# Altium PCB AVP32F2812_EVM_V1.0.PcbDoc (part 3 of 3)
Units mil, origin at the board's own origin, x right, y up, seen from the top; angles counter-clockwise.
Board outline 5669.29 x 3897.64 mil, 2 copper layers (Top Layer, Bottom Layer); 154 components, 189 nets, 732 pads, 469 vias.
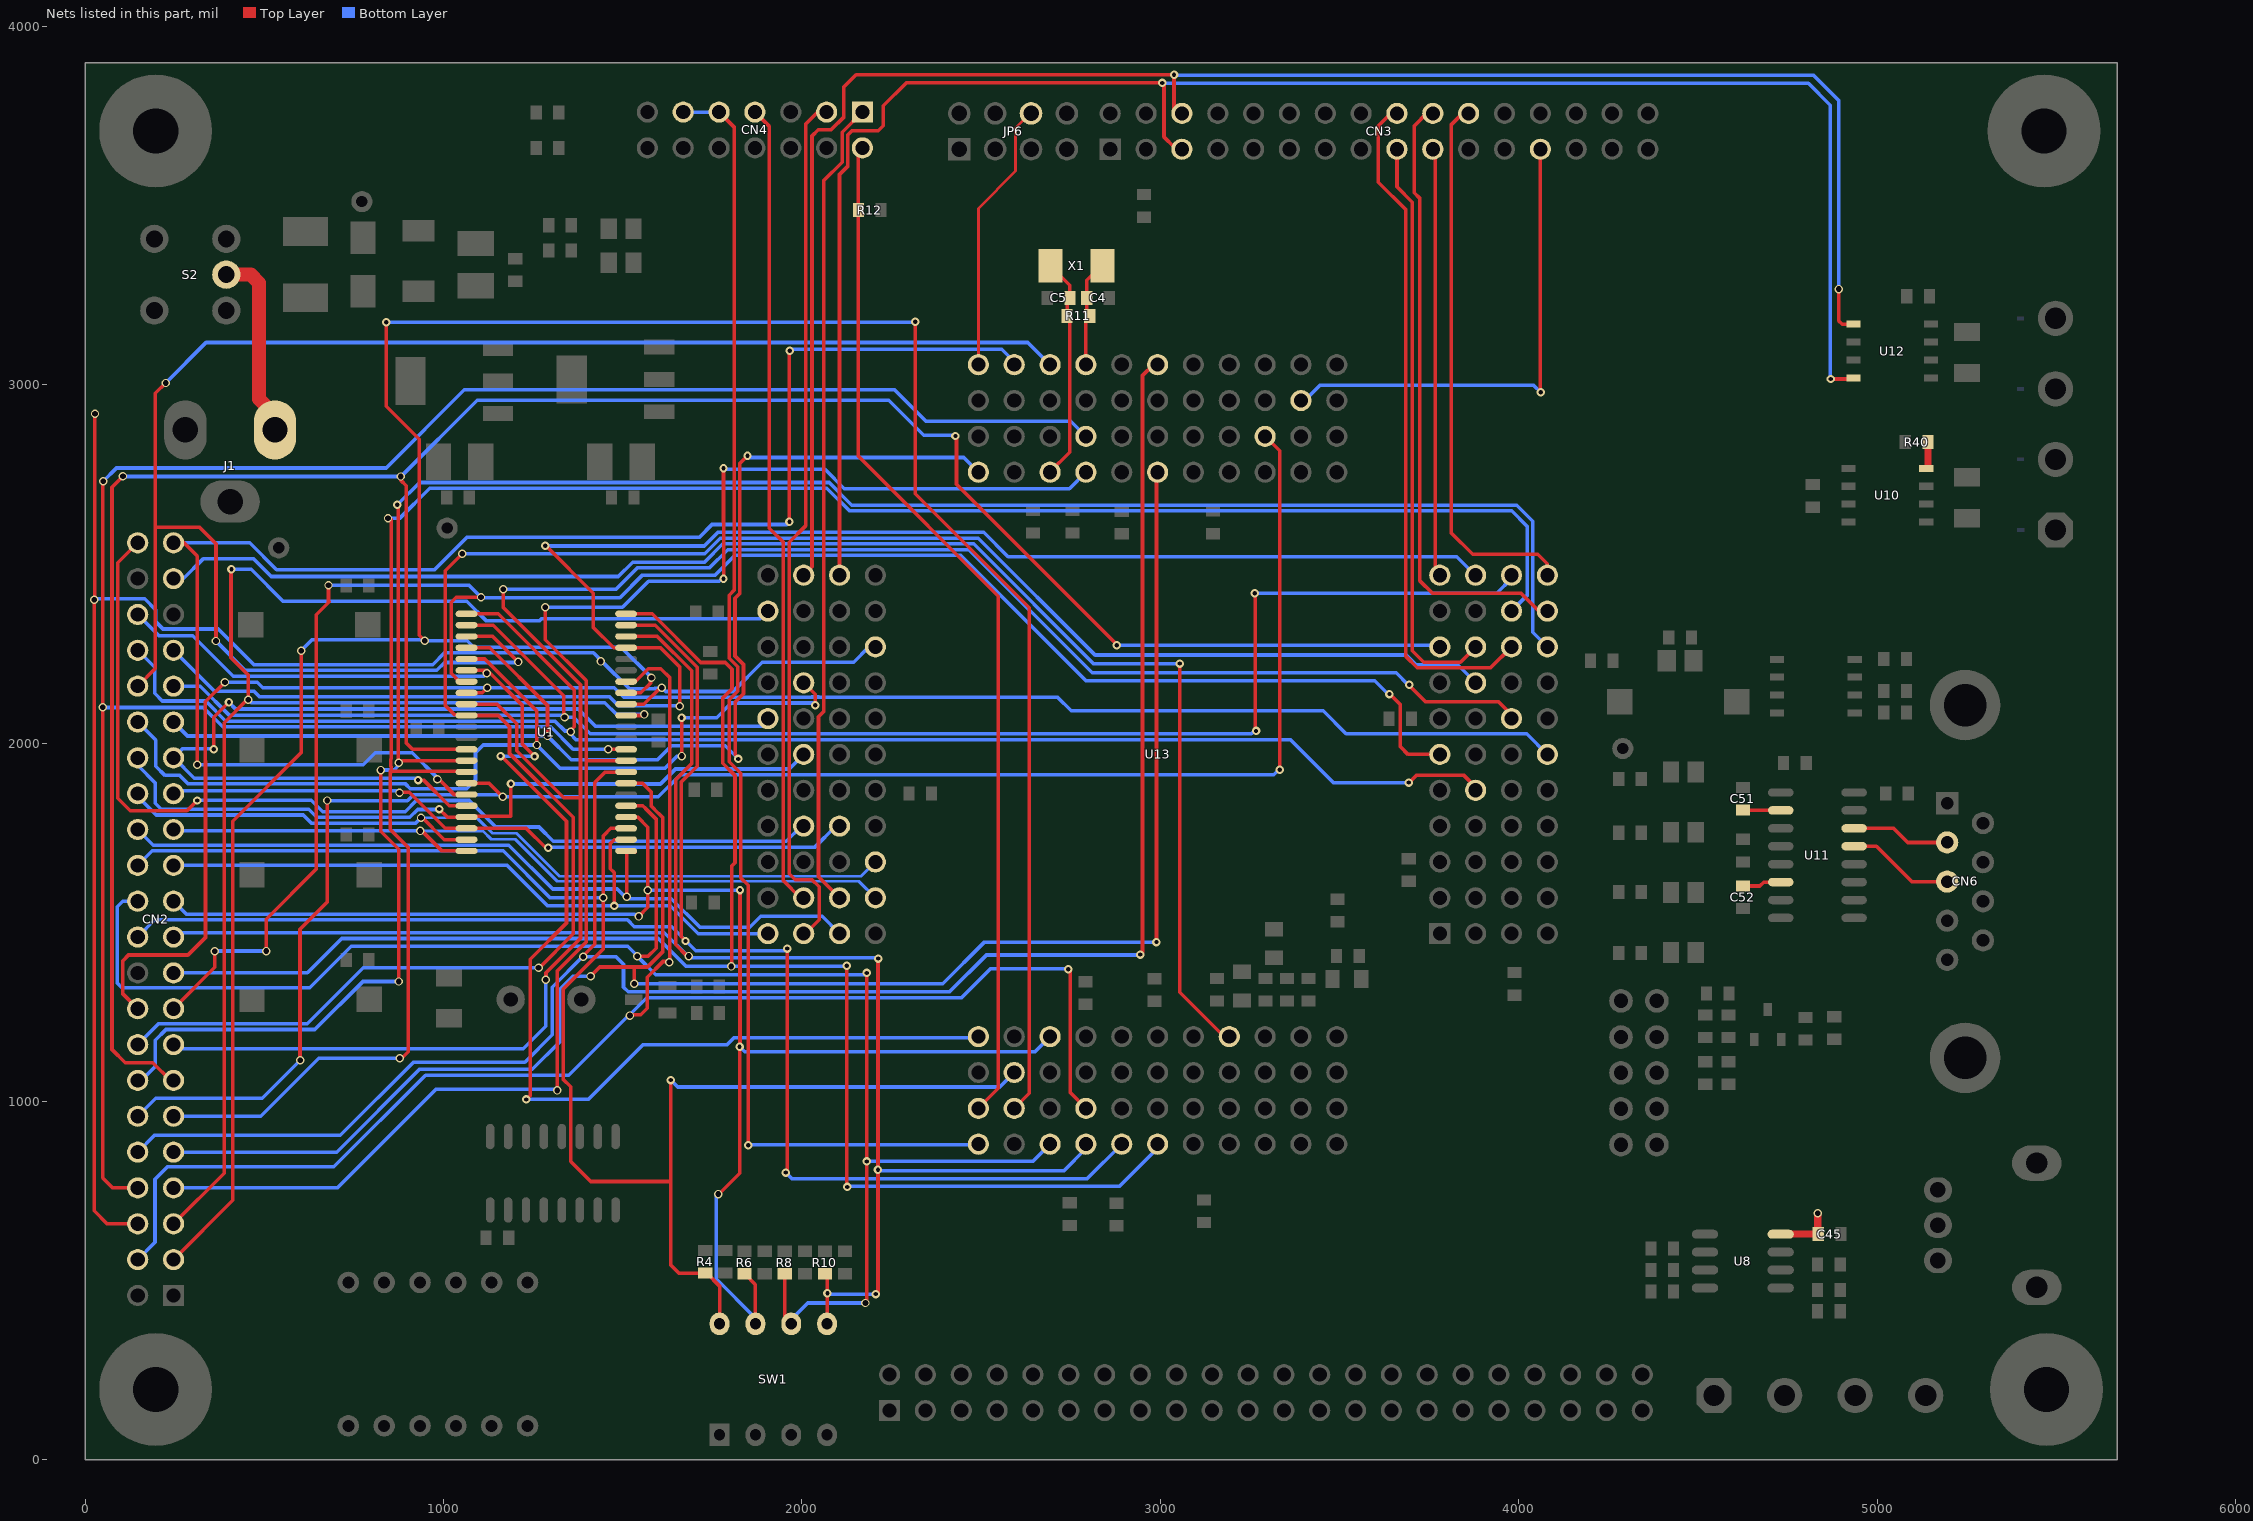
[diagram p3: the nets of this part, all layers, seen from the top]

## Via types
v1: diameter 23.62, hole 11.81, Top Layer to Bottom Layer, tented both sides, 308 vias
v2: diameter 23.62, hole 15.75, Top Layer to Bottom Layer, 161 vias

## Nets (pads, with @x,y where several pads share a name; then routed paths per layer and width w, separated by ;. In a path a pad name is that pad's centre, name@x,y a point inside that pad or via, vN(x,y) a via of type N, cw(c..) or ccw(c..) an arc to the next point about the centre after c; other vN are vias at no path point) (continued)
NetR40_2: R40.2 U10.8 | length 73.6
  Top Layer w19.68: U10.8@5140.98,2766.8 5141.34,2766.8 5141.5,2766.96 R40.2@5141.5,2840
R/W: CN3.25 U13.51 | length 1380.2
  Top Layer w10: CN3.25@4044,3658 4060,3642 4060,2980 v1(4061,2979)
  Bottom Layer w10: U13.51@3392.13,2955.9 3402.9,2955.9 3445,2998 4042,2998 v1(4061,2979)
RS232_1_RX: CN6.3 U11.13 | length 300.3
  Top Layer w10: U11.13@4935.51,1712.28 4997.72,1712.28 5096.24,1613.76 CN6.3@5195,1613.76
RS232_1_TX: CN6.2 U11.14 | length 275.8
  Top Layer w10: U11.14@4935.51,1762.28 5045.44,1762.28 5084.8,1722.92 CN6.2@5195,1722.92
SCIRXDC: CN3.6 U12.1 U13.91 | length 5024.6
  Top Layer w10: U13.91@2004.73,2468.5 2028,2491.78 2028,3694 2045,3711 2081,3711 2117,3747 2117,3831 2150.81,3864.81 3037.19,3864.81 v1@3038,3864 ; v1(3038,3865) v1@3038,3864 ; CN3.6@3044,3758 3038,3764 v1@3038,3864 ; v2(4893,3267) 4893,3178 4902,3169 U12.1@4933.73,3169
  Bottom Layer w10: v1(3038,3865) 3038,3860 3041,3863 4823,3863 4893,3793 v2(4893,3267)
SCITXDC: CN3.5 U12.4 U13.90 | length 5131.3
  Top Layer w10: U13.90@2110,2473.78 U13.90@2104.73,2468.5 2104.73,3586.73 2128.13,3610.13 2128.13,3697.63 2139.5,3709 2213,3709 2227,3723 2227,3778 2291,3842 v1(3005,3842) ; CN3.5@3039,3662.41 3010,3691.41 3010,3837 v1@3005.5,3841.5 ; v1(4870,3016) 4930.73,3016 U12.4@4933.73,3019 ; v1(3005,3842) 3005,3841 v1@3005.5,3841.5 ; v1(3005,3842) 3006,3842 v1@3005.5,3841.5 ; v1(3005,3842) v1@3005.5,3841.5
  Bottom Layer w10: v1(3005,3842) 3006,3841 4808,3841 4869,3780 4869,3017 v1(4870,3016)
SPI_CLK: CN3.17 U13.34 | length 1631.8
  Top Layer w10: CN3.17@3644,3658 3660,3642 3660,3552 3703,3509 3703,2258 3735,2226 3837.02,2226 U13.34@3879.53,2268.5
SPI_CSN: CN3.18 U13.35 | length 1900.8
  Top Layer w10: CN3.18@3644,3752 3644,3758 3608,3722 3608,3565 3685,3488 3685,2242 3717,2210 3921.02,2210 U13.35@3979.53,2268.5
SPI_SIMO: CN3.20 U13.40 | length 1717.1
  Top Layer w10: CN3.20@3744,3758 3708,3722 3708,3536 3723,3521 3723,2454 3759,2418 4006,2418 4055.5,2368.5 U13.40@4079.53,2368.5
SPI_SOMI: CN3.19 U13.41 | length 1204.2
  Top Layer w10: CN3.19@3744,3658 3767,3635 3767,2481.03 U13.41@3779.53,2468.5
TCK: CN4.9 CN4.11 U13.136 | length 3690.7
  Top Layer w10: CN4.9@1768.66,3760.79 1810.45,3719 1810.45,2426.45 1797,2413 1797,2236.63 1820.81,2212.82 1820.81,2145.18 1797,2121.37 1797,1948.25 1829,1916.25 1829,1624 1849.81,1603.19 v1@1849.81,878
  Bottom Layer w10: CN4.11@1668.66,3760.79 CN4.9@1768.66,3760.79 ; v1(1850,878) 1852,880 2491.02,880 U13.136@2492.13,881.1
TDI: CN4.3 U13.131 | length 2433.1
  Top Layer w10: U13.131@2004.73,1468.5 2009.5,1468.5 2048,1507 2048,1599 2028,1619 1981,1619 1964.2,1635.8 1964.2,2560.2 2010,2606 2010,3727 2043.79,3760.79 CN4.3@2068.66,3760.79
TDO: CN4.7 U13.127 | length 2254.2
  Top Layer w10: CN4.7@1868.66,3760.79 1909.19,3720.26 1909.19,3644 1909,3643.81 1909,2600 1948.2,2560.8 1948.2,1615.8 1995.5,1568.5 U13.127@2004.73,1568.5
TMS: CN4.1 U13.126 | length 2284.8
  Top Layer w10: U13.126@2104.73,1568.5 2046,1627.23 2046,2073.75 2061.25,2089 2061.25,2491.92 2061,2492.17 2061,3570 2112.13,3621.13 2112.13,3704.26 CN4.1@2168.66,3760.79 CN4.1@2168.66,3743.66
TRSTN: CN4.2 R12.2 U13.135 | length 2869.2
  Top Layer w10: CN4.2@2168.66,3660.79 2157.5,3649.63 R12.2@2157.5,3487 2157.5,2800.5 2548,2410 2548,1036.98 U13.135@2492.13,981.1
V+: C51.1 U11.2 | length 100.5
  Top Layer w10: C51.1@4625,1813.5 4626.22,1812.28 U11.2@4725,1812.28
V-: C52.1 U11.6 | length 110.3
  Top Layer w10: C52.1@4625,1601.5 4672.44,1601.5 4683.23,1612.28 U11.6@4730.79,1612.28
VDDA: C45.2 U8.8 | length 163
  Top Layer w19.68: U8.8@4730.61,630 C45.2@4833.5,630 ; v2(4834,688) 4834,635.73 4837.61,632.12 C45.2@4835.68,630.19
VIN+: J1.1 S2.2 | length 529.3
  Top Layer w39.37: S2.2@393.7,3307.09 461.94,3307.09 485,3284.02 485,2960.07 529.58,2915.49 J1.1@529.58,2874.02
X1: C5.2 R11.2 U13.77 X1.1 | length 622.7
  Top Layer w10: U13.77@2692.13,2755.9 2692.13,2757.13 2746.65,2811.65 2746.65,3180.35 R11.2@2739.5,3187.5 ; X1.1@2693.16,3332 2747.5,3277.67 C5.2@2747.5,3242 2740,3234.5 R11.2@2740,3192
X2: C4.1 R11.1 U13.76 X1.2 | length 303.4
  Top Layer w10: U13.76@2792.13,3055.9 R11.1@2792.13,3181.63 ; R11.1@2792.13,3183.63 R11.1@2792.13,3181.63 ; R11.1@2802.5,3192 R11.1@2792.13,3181.63 ; R11.1@2804,3195.5 2794.5,3204.99 2794.5,3291.5 2835,3332 X1.2@2838.83,3332
XA0: CN2.38 U1.1 U13.18 | length 4473.6
  Top Layer w10: U1.1@1064.08,2360.71 1152.44,2360.71 1365,2148.16 1365,2045.9 1354.44,2035.34 v2(1354.44,2031.65) ; v1@3693,1889 3714,1910 3847,1910 3879.53,1877.47 U13.18@3879.53,1868.5
  Bottom Layer w10: CN2.38@146.61,2259.05 194,2211.67 194,2139 215.44,2117.56 336.44,2117.56 392.72,2061.28 1138.77,2061.28 1138.87,2061.38 1311.12,2061.38 1338.68,2033.81 1352.29,2033.81 v2(1354.44,2031.65) 1354.44,2024.56 1369,2010 3362,2010 3482,1890 v1(3693,1890)
XA1: CN2.35 U1.2 U13.43 | length 4624
  Top Layer w10: U1.2@1064.08,2329.21 1138.44,2329.21 1335.47,2132.19 1335.47,2074.49 v2(1337.47,2072.48) ; v1@3264,2418 3264.19,2417.81 3264.19,2036.81 v1(3267,2034)
  Bottom Layer w10: CN2.35@246.61,2159.05 320.95,2159.05 402.72,2077.28 1132.14,2077.28 1132.24,2077.38 1338.99,2077.38 1339.09,2077.28 1340.1,2076.64 1341.53,2075.74 v2@1345.34,2072.48 ; v2(1337.47,2072.48) v2@1345.34,2072.48 ; v1@3267,2039 3254,2026 1409,2026 1362.52,2072.48 v2@1345.34,2072.48 ; v1@3269,2418 3938,2418 3979.53,2459.53 U13.43@3979.53,2468.5
  other v1: 3263,2418
XA2: CN2.36 U1.3 U13.80 | length 4938.1
  Top Layer w10: CN2.36@146.61,2159.05 196,2208.44 196,2601.83 ; v2(224.44,3004.83) 196,2976.38 196,2601.83 ; v2(365,2285) 365,2556.27 319.44,2601.83 196,2601.83 ; U1.3@1064.08,2297.72 1137.16,2297.72 v2(1208.34,2226.54)
  Bottom Layer w10: v2(224.44,3004.83) 337.43,3117.81 2630.22,3117.81 U13.80@2692.13,3055.9 ; v2(365,2285) 447,2203 980.94,2203 1002.94,2225 1206.79,2225 v2(1208.34,2226.54)
XA3: CN2.33 U1.4 U13.85 | length 3564.8
  Top Layer w10: U1.4@1064.08,2266.22 1128.78,2266.22 1290,2105 v2(1290,2020) ; v1(1822,1956) 1822,1960 1814,1968 1814,2115 1836.81,2137.81 1836.81,2219.44 1813,2243.25 1813,2404 1826.45,2417.45 1826.45,2780.45 v1(1848,2802)
  Bottom Layer w10: CN2.33@246.61,2059.05 285.67,2020 v2(1290,2020) 1356,1954 1449.63,1954 1449.72,1954.09 1597.09,1954.09 1636,1993 1786,1993 v1@1815.5,1963.5 ; v1(1848,2802) 1853,2797 2451.03,2797 U13.85@2492.13,2755.9
XA4: CN2.34 U1.5 U13.103 | length 2701.4
  Top Layer w10: U1.5@1064.08,2234.72 1114.55,2234.72 1259.81,2089.46 v2(1259.81,1994.81) ; v1(1664,2071) 1665,2070 v2(1665,1964) ; U13.103@2004.73,2168.5 2037,2136.23 v1(2037,2106)
  Bottom Layer w10: CN2.34@146.61,2059.05 197,2008.67 197,1936 223,1910 264,1910 287.81,1886.19 893.81,1886.19 907,1873 1064.73,1873 1089,1897.27 1089,1972.81 1111,1994.81 v2(1259.81,1994.81) 1324.62,1930 1618,1930 1652,1964 v2(1665,1964) ; v1(1664,2071) 1762,2071 1802.98,2111.98 2031.02,2111.98 v1(2037,2106) v1@2038,2105
XA5: CN2.31 U1.18 U13.108 | length 2697.3
  Top Layer w10: v1(359,1983) 359,2072 v1(401,2114) v1@403,2116 ; v1(929,1897) 944,1897 1015.72,1825.28 U1.18@1064.08,1825.28
  Bottom Layer w10: v1@361,1984 271.56,1984 CN2.31@246.61,1959.05 247.95,1959.05 304.81,1902.19 923.81,1902.19 v1(929,1897) ; v1(401,2114) 419.71,2095.29 1375.71,2095.29 1424,2047 1897,2047 1904.73,2054.73 U13.108@1904.73,2068.5
XA6: CN2.32 U1.19 U13.111 | length 2122.3
  Top Layer w10: v1(988,1816) 1010.22,1793.78 U1.19@1064.08,1793.78 1066.3,1796 1188,1796 v1(1188,1887)
  Bottom Layer w10: CN2.32@146.61,1959.05 146.61,1938.39 196,1889 196,1832 212.42,1815.58 623.42,1815.58 646,1793 905.74,1793 927.55,1814.81 985.81,1814.81 v1@991,1820 ; v1(1188,1887) 1189,1886 1605,1886 1647,1928 1887.92,1928 ; 1887.94,1927.98 1964.2,1927.98 U13.111@2004.73,1968.5
XA7: CN2.29 U1.20 U13.118 | length 1953.8
  Top Layer w10: v2(877,1862) 878,1863 904.26,1863 1004.98,1762.28 U1.20@1064.08,1762.28 1064.8,1763 1230,1763 1285,1708 v1(1292,1708)
  Bottom Layer w10: CN2.29@246.61,1859.05 254.56,1867 872,1867 v2(877,1862) ; v1(1292,1708) 1293,1709 1887.91,1709 ; 1887.94,1709.03 1921.51,1709.03 ; 1921.54,1709 1987.91,1709 ; 1987.94,1709.03 2021.51,1709.03 ; 2021.54,1709 2035,1709 2094.5,1768.5 U13.118@2104.73,1768.5
XA8: CN2.30 U1.21 U13.121 | length 2344.9
  Top Layer w10: v2(937,1792) 937,1796 1002.21,1730.79 U1.21@1064.08,1730.79
  Bottom Layer w8: v2(937,1792) 1092.8,1792 1136.22,1748.58 1203.42,1748.58 1323.19,1628.81 2165.03,1628.81 U13.121@2204.73,1668.5
  Bottom Layer w10: CN2.30@146.61,1859.05 146.61,1851.39 198.42,1799.58 608.42,1799.58 631,1777 922,1777 v2(937,1792)
XA9: CN2.27 U1.22 U13.125 | length 2189.2
  Top Layer w10: v2(935,1755) 939.77,1755 995.48,1699.29 U1.22@1064.08,1699.29
  Bottom Layer w8: v2(935,1755) 1110,1755 1133,1732 1200.2,1732 1317.39,1614.81 2158.42,1614.81 U13.125@2204.73,1568.5
  Bottom Layer w10: CN2.27@246.61,1759.05 249.67,1756 934,1756 v2(935,1755)
XA10: CN2.28 U1.23 U13.130 | length 2263.7
  Top Layer w10: v2(1511,1571) 1511,1694.89 1508,1697.89 U1.23@1509.4,1699.29 1531.44,1699.29 U1.23@1535,1695.74
  Bottom Layer w10: CN2.28@146.61,1759.05 190.09,1715.58 1182.05,1715.58 1304.63,1593 1485,1593 1507,1571 v2(1511,1571) 1511,1567 1511.81,1566.19 1635.06,1566.19 1715.25,1486 1854,1486 1885,1517 2056.23,1517 U13.130@2104.73,1468.5
XA11: CN2.25 U1.24 U13.132 | length 1964.5
  Top Layer w10: v1(1476,1546) 1476,1639 1465,1650 1465,1720 1475.79,1730.79 U1.24@1509.4,1730.79
  Bottom Layer w10: CN2.25@246.61,1659.05 1176.95,1659.05 1290,1546 v1(1476,1546) 1632.63,1546 1710.12,1468.5 U13.132@1904.73,1468.5
XA12: CN2.26 R4.1 SW1.8 U1.25 U13.138 | length 4471.6
  Top Layer w10: U1.25@1509.4,1762.28 1466.28,1762.28 1446,1742 v2(1446,1569) 1446,1426.13 1446.07,1426.07 1333.44,1313.44 1333.44,1062.56 1355,1041 1355,833 1411,777 1634,777 ; v1@1634,1062 v1(1634,1060) 1634,777 ; R4.1@1730,521.5 1656.5,521.5 1634,544 1634,777 ; R4.1@1733.94,521.5 1770,485.44 SW1.8@1770,380
  Bottom Layer w10: CN2.26@146.61,1659.05 187.14,1699.58 1166.42,1699.58 1297,1569 v2(1446,1569) ; v1(1634,1060) 1653.42,1040.58 2551.6,1040.58 U13.138@2592.13,1081.1
XA13: CN2.23 R6.1 SW1.7 U1.26 U13.141 | length 4232
  Top Layer w10: U1.26@1509.4,1793.78 1541.49,1793.78 1570,1765.27 v2(1570,1590) 1570,1542.38 v2(1544.14,1516.52) ; v2(1766,742) 1766,740 1826,800 v1(1826,1153) 1827,1154 v1(1827,1590) ; R6.1@1840,519.5 1870,489.5 SW1.7@1870,380
  Bottom Layer w10: CN2.23@246.61,1559.05 282.67,1523 1533.97,1523 1540.45,1516.52 v2(1544.14,1516.52) ; v2(1570,1590) v1(1827,1590) ; v2(1766,742) 1760.72,736.72 1760.72,505.28 1870,396 SW1.7@1870,380 ; v1(1826,1153) 1840,1139 2650.02,1139 U13.141@2692.13,1181.1
XA14: CN2.24 R8.1 SW1.6 U1.27 U13.144 | length 4823.4
  Top Layer w10: U1.27@1509.4,1825.28 1556.11,1825.28 1563.25,1818.14 1563.25,1817.87 1592.65,1788.47 1592.79,1788.47 1593,1788.26 1593,1428 1570,1405 v2(1540,1405) ; R8.1@1952,519.5 1952,398 SW1.6@1970,380 ; v2(2177,438) 2176,439 2181,444 v1(2181,833) v1(2181,1359)
  Bottom Layer w10: CN2.24@146.61,1559.05 105.17,1559.05 89.44,1543.33 89.44,1330.83 102.44,1317.83 626.83,1317.83 742,1433 1514,1433 1540,1407 v2(1540,1405) 1541,1405 1591.81,1354.19 2180.19,1354.19 v1@2181,1355 ; SW1.6@1970,380 1970,392 2016,438 v2(2177,438) ; v1(2181,833) 2644.02,833 U13.144@2692.13,881.1 U13.144@2692.13,874.13
XA15: CN2.21 R10.1 SW1.5 U1.42 U13.148 | length 4899.8
  Top Layer w10: U1.42@1509.4,2297.72 1596.28,2297.72 1692,2202 1692,1943 1647.44,1898.44 1647.44,1843.45 1647.54,1843.36 1647.54,1437.46 1679,1406 v2(1684,1406) ; R10.1@2067.94,519.5 R10.1@2064,519.5 2070,513.5 SW1.5@2070,380 ; v1(2206,463) 2212,469 v1(2212,810) v1@2212,1399 ; v1@2207,1399 v1@2212,1399 ; v1@2212,1401 v1@2212,1399 ; v1(2213,1399) v1@2212,1399
  Bottom Layer w10: CN2.21@246.61,1459.05 258.56,1471 1616,1471 1685.19,1401.81 2134.45,1401.81 2135.26,1401 2212,1401 v1@2215,1404 ; v1(2071,465) 2072,466 2075,463 v1(2206,463) ; v1@2218,807 2731,807 2792.13,868.13 U13.148@2792.13,881.1
XA16: CN2.22 U1.43 U13.152 | length 4513.7
  Top Layer w10: U1.43@1509.4,2329.21 1590.79,2329.21 1708,2212 1708,1936 1663.54,1891.54 1663.54,1459.46 v1(1675,1448) ; v1@1956,803 1959,806 v1(1959,1427)
  Bottom Layer w10: CN2.22@146.61,1459.05 194.56,1507 1513,1507 1532,1488 1637,1488 1703.93,1421.07 1953.07,1421.07 v1(1959,1427) ; v1(1955,802) 1971.81,785.19 2796.21,785.19 U13.152@2892.13,881.1
XA17: CN2.19 U1.44 U13.156 | length 4719.3
  Top Layer w10: U1.44@1509.4,2360.71 1581.92,2360.71 1717.63,2225 1786,2225 1804.81,2206.19 1804.81,2151.81 1779,2126 1779,1943.63 1813,1909.63 1813,1666 1804.19,1657.19 1804.19,1378.19 v2(1803,1377) ; v1@2125,763 v1(2125,1379)
  Bottom Layer w10: CN2.19@246.61,1359.05 620.18,1359.05 716.12,1455 1599,1455 1677,1377 v2(1803,1377) 2121,1377 v1@2124,1380 ; v1@2124,764 2886,764 2992.13,870.13 U13.156@2992.13,881.1 U13.156@2992.13,893.13
  other v1: 2126,762
XCLKOUT: CN2.44 U13.119 | length 2764.2
  Top Layer w10: CN2.44@146.61,2559.05 91,2503.44 91,1846 126,1811 284,1811 v1(313,1840)
  Bottom Layer w10: v1@316,1841 631,1841 663,1809 893,1809 924,1840 1072,1840 1146,1766 1266.26,1766 1306.26,1726 1956,1726 1998.5,1768.5 U13.119@2004.73,1768.5
XD0: CN2.17 U1.7 U13.21 | length 5259.3
  Top Layer w10: CN2.17@246.61,1259.05 362,1374.44 v2(362,1419) ; v2(505,1420) 505,1509 645,1649 645,2358.38 681,2394.38 679,2396.38 v2(679,2441) ; U1.7@1064.08,2171.73 1044.43,2171.73 1021,2195.16 1021,2392.88 1034.94,2406.83 v2(1104.44,2406.83) ; v1(3639,2137) 3640,2137 3669,2108 3669,1990.5 3691,1968.5 U13.21@3779.53,1968.5
  Bottom Layer w10: v2(362,1419) 362,1413.87 368.13,1420 v2(505,1420) ; v2(679,2441) 1070.27,2441 v2(1104.44,2406.83) 1105.27,2406 1492,2406 1555,2469 1758,2469 1813,2524 2442.37,2524 2792.37,2174 3598,2174 3636,2136 3639,2139 v1(3639,2137)
XD1: CN2.18 U1.8 U13.24 | length 4981.1
  Top Layer w10: CN2.18@146.61,1259.05 105.44,1300.22 105.44,1393.33 120.94,1408.83 286.83,1408.83 335.81,1457.81 335.81,1949.45 335.5,1949.76 335.5,2115.5 v2(390,2170) ; U1.8@1064.08,2140.24 1107.86,2140.24 v2(1122.26,2154.64)
  Bottom Layer w10: v2(390,2170) 480,2170 495.36,2154.64 v2(1122.26,2154.64) 1476.36,2154.64 1502.81,2128.19 1814.08,2128.19 1814.29,2127.98 2026.72,2127.98 2027.55,2128.81 2046.45,2128.81 2047.28,2127.98 2713.02,2127.98 2751,2090 3454,2090 3518,2026 4022.03,2026 U13.24@4079.53,1968.5
XD2: CN2.15 U1.9 U13.27 | length 5952.6
  Top Layer w10: U1.9@1064.08,2108.74 1149.26,2108.74 1204,2054 1204,1979 1335,1848 1380,1848 1382,1850 ; v2(1167,2429) 1167,2378 1382,2163 1382,1850 ; v2(1285,1340) 1285.81,1340.81 1285.81,1359.81 1382,1456 1382,1850 ; v1(3694,2163) 3692,2163 3739,2116 3943,2116 3979.53,2079.47 U13.27@3979.53,2068.5
  Bottom Layer w10: CN2.15@246.61,1159.05 258.67,1147 1222,1147 1285,1210 v2(1285,1340) ; v2(1167,2429) 1481,2429 1541,2489 1742,2489 1793,2540 2466,2540 2810,2196 3658,2196 3691,2163 v1(3694,2163)
XD3: CN2.16 U1.10 U13.30 | length 5657.6
  Top Layer w10: v2(1052.44,2528.83) 1005,2481.38 1005,2105 1031.3,2078.7 1062.62,2078.7 U1.10@1064.08,2077.24 1152.76,2077.24 1184,2046 1184,1971.26 1362,1793.26 1362,1468 1265,1371 v2(1265,1373)
  Bottom Layer w10: CN2.16@146.61,1159.05 204.56,1217 620,1217 776,1373 v2(1265,1373) ; v2(1052.44,2528.83) 1053.27,2528 1728.37,2528 1772.37,2572 2491.63,2572 2817.63,2246 3686,2246 3713.48,2218.52 3829.52,2218.52 U13.30@3879.53,2168.5
XD4: CN2.13 U1.13 U13.33 | length 6874.9
  Top Layer w10: v2(105.44,2744.83) 75,2714.38 75,1145.27 112.27,1108 189,1108 237.95,1059.05 CN2.13@246.61,1059.05 ; v2(881,2744) 881,2733 896,2718 896,2000.21 913.44,1982.76 U1.13@1064.08,1982.76 ; v1(2428,2857) 2431,2854 2431,2722 2878,2275 v1(2878,2273)
  Bottom Layer w10: v2(105.44,2744.83) 106.2,2744.07 880.93,2744.07 v2(881,2744) 1094,2957 2242,2957 2340,2859 2426,2859 v1(2428,2857) ; v1(2878,2273) 3766.02,2273 3775.02,2264 U13.33@3779.53,2268.5
XD5: CN2.14 U1.14 U13.36 | length 6073.1
  Top Layer w10: v2(825,1925) 825,1754 875,1704 v2(875,1335) ; v1@873,2661 873,1947 v2(875,1945) 878.69,1945 884.95,1951.26 U1.14@1064.08,1951.26
  Bottom Layer w10: CN2.14@146.61,1059.05 157.05,1059.05 196,1098 196,1171.38 225.62,1201 641,1201 775,1335 v2(875,1335) ; v2(825,1925) 862,1925 875,1938 v2(875,1945) ; v1(871,2665) 933.19,2727.19 2075.81,2727.19 2139,2664 3994,2664 4039,2619 4039,2309.03 U13.36@4079.53,2268.5
XD6: CN2.11 U1.15 U13.39 | length 5987.4
  Top Layer w10: v2(845,2627) 845,2634 854,2625 854,1956.26 852.19,1954.45 852.19,1935.55 854,1933.74 854,1921.81 ; 851,1921.28 851,1759.27 901.44,1708.83 901.44,1139.44 883,1121 v2(878,1121) ; U1.15@1064.08,1919.76 1062.03,1921.81 854,1921.81 ; 854,1921.81 854,1919.34 851.53,1921.81 854,1921.81
  Bottom Layer w10: CN2.11@246.61,959.05 490.05,959.05 652,1121 v2(878,1121) ; v2(845,2627) 877,2627 961.19,2711.19 2069.18,2711.19 2132.37,2648 3980,2648 4023,2605 4023,2411.98 U13.39@3979.53,2368.5
XD7: CN2.12 U1.16 U13.54 | length 5039.8
  Top Layer w10: v2(600,1115) 599.44,1115.56 599.44,1480.44 675,1556 v2(675,1840) ; U1.16@1064.08,1888.27 1126.73,1888.27 v2(1165,1850) ; U13.54@3292.13,2855.9 3332.65,2815.38 3332.65,1926.35 v1(3333,1926)
  Bottom Layer w10: CN2.12@146.61,959.05 196.56,1009 494,1009 v2(600,1115) ; v2(675,1840) 674.62,1840 673.81,1839.19 899.19,1839.19 916,1856 1159,1856 v2(1165,1850) 1165.09,1850.09 1599.09,1850.09 1661,1912 1881.29,1912 3315.98,1911.98 3330,1926 v1(3333,1926)
XD8: CN2.9 U1.29 U13.65 | length 5086.1
  Top Layer w10: v2(1410,1350) 1435.39,1375.39 1530,1375.39 ; U1.29@1509.4,1888.27 1554.93,1888.27 1579.25,1863.95 1579.25,1824.5 1599.28,1804.47 1599.41,1804.47 1612,1791.89 1612,1418.56 1568.84,1375.39 1530,1375.39 ; v2(1532.44,1328.83) 1532.44,1372.95 1530,1375.39 ; v1@2991,1446 2989,1448 2989,2752.78 U13.65@2992.13,2755.9
  Bottom Layer w10: CN2.9@246.61,859.05 702.05,859.05 932.83,1089.83 1247.83,1089.83 1324,1166 1324,1313 1361,1350 v2(1410,1350) ; v2(1532.44,1328.83) 2392.44,1328.83 2507.62,1444 v1@2989,1444
  other v1: 2989,1445
XD9: CN2.10 U1.30 U13.68 | length 5490.4
  Top Layer w10: v2(1389.53,1404.53) 1389.53,1406.65 1422,1439.13 1422,1890 1451.38,1919.38 1509.02,1919.38 U1.30@1509.4,1919.76 ; v1@2945,1410 2950,1415 2950,3026 2979.9,3055.9 U13.68@2992.13,3055.9
  Bottom Layer w10: CN2.10@146.61,859.05 193.56,906 712,906 916,1110 1227,1110 1303,1186 1303,1319 1388.53,1404.53 v2(1389.53,1404.53) 1480.47,1404.53 1502,1383 1502,1319 1514.98,1306.02 2411.63,1306.02 2514.62,1409 v1@2941,1409
  other v1: 2944,1410
XD10: CN2.7 U1.31 U13.73 | length 4621.4
  Top Layer w10: v2(1284,2379) 1284,2288.59 1398,2174.59 1398,1951 ; v2(1317,1031) 1317,1364.26 1398,1445.26 1398,1951 ; U1.31@1509.4,1951.26 1398.26,1951.26 1398,1951 ; v1(1781,2767) v1@1782,2460
  Bottom Layer w10: CN2.7@246.61,759.05 703.05,759.05 977.81,1033.81 1314.19,1033.81 v2(1317,1031) ; v2(1284,2379) 1499,2379 1572,2452 1769,2452 1781,2464 v1(1781,2459) ; v1@1782,2764 2064,2764 2118,2710 2746.22,2710 U13.73@2792.13,2755.9
XD11: CN2.8 U1.32 U13.74 | length 6464
  Top Layer w10: v2(50.44,2730.83) 49,2729.38 v2(49,2100) 49,787 76.95,759.05 CN2.8@146.61,759.05 ; v2(1459.44,1982.76) U1.32@1509.4,1982.76
  Bottom Layer w10: v2(49,2100) 49.42,2099.58 163.4,2099.58 163.5,2099.49 229.73,2099.49 229.83,2099.58 329.42,2099.58 383.62,2045.38 385.99,2045.38 386.09,2045.28 1145.4,2045.28 1145.49,2045.38 1298.62,2045.38 1361.24,1982.76 v2(1459.44,1982.76) ; v2(50.44,2730.83) 87.26,2767.64 839.64,2767.64 1058,2986 2258,2986 2346,2898 2750.03,2898 U13.74@2792.13,2855.9
XD12: CN2.5 U1.35 U13.96 | length 4674.7
  Top Layer w10: CN2.5@246.61,659.05 387.72,800.16 387.72,2056.72 452.54,2121.54 v2(454.94,2121.54) 454.94,2190.06 407,2238 407,2483 v1@408,2484 ; U1.35@1509.4,2077.24 1557.24,2077.24 v2(1560,2080)
  Bottom Layer w10: v1(408,2485) 463,2485 552,2396 1064.63,2396 1119.69,2340.94 1267,2340.94 1273.06,2347 1883.22,2347 U13.96@1904.73,2368.5 ; v2(454.94,2121.54) 463.49,2113 1450,2113 1483,2080 v2(1560,2080)
XD13: CN2.6 U1.36 U13.97 | length 4897.3
  Top Layer w10: v2(27.44,2918.83) 26.22,2917.6 26.22,2401.22 v2(25,2400) 25,695 60.95,659.05 CN2.6@146.61,659.05 ; v2(1439,2228) 1439,2227.31 v2@1443,2223.31 ; U1.36@1486.26,2108.74 U1.36@1509.4,2108.74 1558.74,2108.74 v2@1605,2155
  Bottom Layer w10: v2(25,2400) 28,2403 166,2403 196.44,2372.56 196.44,2339.17 217.09,2318.53 371.47,2318.53 471,2219 969.62,2219 1002.44,2251.83 1418.17,2251.83 v2@1442,2228 ; v2(1439,2228) v2@1442,2228 ; U13.97@2204.73,2268.5 2186.5,2268.5 2144,2226 1889.26,2226 1807.45,2144.19 1619.54,2144.19 v2(1608.73,2155) 1606.12,2152.39 1589.52,2152.39 1589.41,2152.28 1517.72,2152.28 v2@1442,2228
XD14: CN2.3 U1.37 U13.139 | length 7739.3
  Top Layer w10: CN2.3@246.61,559.05 411.85,724.29 411.85,1782.23 602.44,1972.83 v2(602.44,2257.83) ; v1(840,3174) 840,2940 932,2848 932,2301.27 v2(947.44,2285.83) ; U1.37@1509.4,2140.24 1550.24,2140.24 1577.39,2167.39 1577.39,2179.39 v2(1580,2182) ; v1(2316,3176) 2316,2696 2634,2378 2634,1022.98 U13.139@2592.13,981.1
  Bottom Layer w10: v2(602.44,2257.83) 632.62,2288 944,2288 v2@946.81,2285.19 ; v1(840,3174) v1@2320,3174 ; v2(1580,2182) 1580,2183 1495.15,2267.85 1084,2267.85 1066.03,2285.83 v2(947.44,2285.83) v2@946.81,2285.19 ; v2@946.81,2285.19 945.47,2283.86 948.14,2283.86 v2@946.81,2285.19
XD15: CN2.4 U1.38 U13.147 | length 4607.6
  Top Layer w10: U1.38@1509.4,2171.73 1534.73,2171.73 1571,2208 1606.35,2208 1631.54,2182.81 1631.54,2145.55 1631.44,2145.46 1631.44,1836.83 1631.54,1836.73 1631.54,1390.92 v2@1631.44,1390.83 ; v2(1520,1240) 1522.13,1242.13 1550.13,1242.13 1568,1260 1568,1346.61 1612.22,1390.83 1627.89,1390.83 v2(1629.67,1389.05) ; v1(2743,1369) 2749,1363 2749,1024.23 U13.147@2792.13,981.1
  Bottom Layer w10: CN2.4@146.61,559.05 195,607.44 195,783 229.83,817.83 693.83,817.83 949.83,1073.83 1349.44,1073.83 v2@1517.81,1242.19 ; v2(1520,1240) 1522.13,1242.13 1522.13,1245.13 1567.02,1290.02 2445.02,1290.02 2525,1370 2742,1370 v1(2743,1369)
XRDN: CN2.37 U1.41 U13.42 | length 4815.1
  Top Layer w10: v1@1287,2549 1418,2418 1418,2322.69 1474.47,2266.22 U1.41@1509.4,2266.22 1605.15,2266.22 1659,2212.37 v2(1659,2103)
  Bottom Layer w10: CN2.37@246.61,2259.05 361.41,2144.26 445.4,2144.26 445.5,2144.35 471.65,2144.35 486,2130 1462,2130 1488,2104 v2@1661,2104 ; v1@1285,2550 1727.75,2550 1765.75,2588 2507,2588 2575,2520 3827,2520 3878.5,2468.5 U13.42@3879.53,2468.5
  other v1: 1284,2551
XREADY: CN2.41 U13.161 | length 4132.3
  Top Layer w10: v1(3054,2222) 3054,1305 3177.9,1181.1 U13.161@3192.13,1181.1
  Bottom Layer w10: CN2.41@246.61,2459.05 274.05,2459.05 329,2514 470,2514 519,2465 1487.37,2465 1527.37,2505 1728,2505 1779,2556 2479,2556 2814,2221 v1@3053,2221
XWEN: CN2.43 U1.17 U13.84 | length 4413.3
  Top Layer w10: CN2.43@246.61,2559.05 275.95,2559.05 313,2522 v2(313,1940) ; v2(983,1899) 987,1899 1029.23,1856.77 U1.17@1064.08,1856.77 ; v1(1965,2618) 1965,3090 1968,3093 v1(1966,3095)
  Bottom Layer w10: CN2.43@246.61,2559.05 458.96,2559.05 534.01,2484 974.88,2484 1064.88,2574 1713,2574 1749,2610 1957,2610 v1(1965,2618) ; v2(313,1940) 776,1940 809,1973 913,1973 983,1903 v2(983,1899) ; v1(1966,3095) 1970,3099 2557,3099 2592.13,3063.87 U13.84@2592.13,3055.9
XZCS7N: CN2.40 U1.6 U13.133 | length 3926.9
  Top Layer w10: U1.6@1064.08,2203.23 1108.08,2203.23 1116.31,2195 v2(1120,2195) ; v2@1111.77,2203.23 1121.77,2203.23 1220,2105 1220,1997 v1(1254,1963) ; v1(1159,1964) 1161,1964 1343,1782 1343,1498 1242,1397 1242,1017 v1(1231,1006)
  Bottom Layer w10: CN2.40@146.61,2359.05 206.09,2299.58 300.42,2299.58 413,2187 1112,2187 v2(1120,2195) ; v1(1159,1964) 1254,1964 1255,1963 v1(1254,1963) ; v1(1231,1006) 1404,1006 1556,1158 1790,1158 1810.19,1178.19 2492.13,1178.19 U13.133@2492.13,1181.1
ZCS1: CN3.22 U13.44 | length 1520.2
  Top Layer w10: CN3.22@3844,3758 3812,3726 3812,2586 3871,2527 4053,2527 4079.53,2500.47 U13.44@4079.53,2468.5
ZCS2: JP6.6 U13.88 | length 761.1
  Top Layer w8: U13.88@2492.13,3055.9 2492.13,3492.13 2596,3596 2596,3716 JP6.6@2637,3757
pads on no net: CN6.0 CN6.1 CN6.4 CN6.6 CN6.7 CN6.8 CN6.9 H1.1 H3.1 H5.1 H7.1 R38.0 S2.0 S2.1 U1.28 U10.5 U11.7 U11.8 U11.9 U11.10 U13.66 U13.67 U13.164
copper on no net:
  other v2: 4934.44,1936.83 4638.44,1963.83 4935.44,2008.83 4638.44,2021.83

## Polygon pours and split planes (outlines as drawn)
DGND on Top Layer "DGND_L01_P008" (solid, remove dead copper, pour order 8): 3369,236.75 3339,266.75 3199,266.75 3174,291.75 3174,930 3204,930 3245,971 3245,1358 3707,1820 4078,1820 4151,1747 4273.74,1747 4344,1676.74 4344,1357 5779,1357 5779,3931.75 64,3931.75 19,3976.75 19,131.75 184,-33.25 3364,-33.25 3369,-28.25 3369,1.75
AGND on Top Layer "AGND_L01_P007" (solid, remove dead copper, pour order 7): 3623,1843 3953,1843 4068,1728 4223,1728 4308,1643 4308,1343 5683,1343 5913,1113 5913,138 5753,-22 3378,-22 3378,238 3318,298 3188,298 3188,948 3258,1018 3258,1393 3298,1433 3324,1433 3623,1732
AGND on Bottom Layer "AGND_L01_P007" (solid, remove dead copper, pour order 14): 3623.73,1844 3953.73,1844 4068.73,1729 4223.73,1729 4308.73,1644 4308.73,1344 5683.73,1344 5913.73,1114 5913.73,139 5753.73,-21 3378.73,-21 3378.73,239 3318.73,299 3188.73,299 3188.73,949 3258.73,1019 3258.73,1394 3298.73,1434 3320,1434 3593.73,1707.73 3593.73,1814
DGND on Bottom Layer "DGND_L01_P008" (solid, remove dead copper, pour order 16): 3368.74,238.47 3338.74,268.47 3198.74,268.47 3173.74,293.47 3173.74,931.73 3203.75,931.73 3244.75,972.73 3244.75,1356.75 3694,1806 4103,1806 4160.28,1748.73 4273.49,1748.73 4343.75,1678.47 4343.75,1356 5778.74,1356 5778.74,3933.47 63.74,3933.47 18.74,3978.47 18.74,63.47 148.74,-66.53 183.74,-31.53 3363.74,-31.53 3368.74,-26.53 3368.74,3.47

## Keep-outs
Keep-Out Layer:
  lines w8: 0,0 5669.29,0 5669.29,3897.64 0,3897.64 0,0

## Other copper
Top Layer:
  pour cut-out: 3670.75,1661 3713.25,1661 3713.25,1650 3670.75,1650
  pour cut-out: 3258,1322.5 3258,1303.5 3455,1303.5 3455,1322.5
  pour cut-out: 4259,34 4272,34 4272,15 4260,15
  pour cut-out: 0,3897.64 0,3503.94 393.7,3503.94 393.7,3897.64
  pour cut-out: 5669.29,3897.64 5275.59,3897.64 5275.59,3503.94 5669.29,3503.94
  pour cut-out: 5669.29,0 5669.29,393.7 5275.59,393.7 5275.59,0
  pour cut-out: 0,0 393.7,0 393.7,393.7 0,393.7
  pour cut-out: 2730,3385 2800,3385 2800,3377 2730,3377
  pour cut-out: 3507,753 3530,753 3530,777 3508,777 3507,776
  pour cut-out: 3148.5,705 3171.5,705 3171.5,729 3149.5,729 3148.5,728
  pour cut-out: 2902.5,698 2925.5,698 2925.5,722 2903.5,722 2902.5,721
  pour cut-out: 2927,486 2926,485 2614,485 2614,469 2613,468 2614,467 2927,467
Bottom Layer:
  pour cut-out: 5033.5,26 5052.5,26 5052.5,6 5033.5,6
  pour cut-out: 5669.29,3897.64 5669.29,3503.94 5275.59,3503.94 5275.59,3897.64
  pour cut-out: 5669.29,0 5275.59,0 5275.59,393.7 5669.29,393.7
  pour cut-out: 0,0 0,393.7 393.7,393.7 393.7,0
  pour cut-out: 0,3897.64 393.7,3897.64 393.7,3503.94 0,3503.94
  pour cut-out: 2807.5,673 2830.5,673 2830.5,697 2808.5,697 2807.5,696

## Silkscreen, mask and mechanical layers (free items; w line width, h text height)
Top Overlay:
  circle w11.81: c648.7,3716 r98.43
  circle w50: c3778,1356 r16.97
  lines w5.9: 2294,21 2294,87 ; 2295,289 2295,347 ; 2378,3807 2378,3879 2380,3881 2808.59,3881 ; 2381,3607 2381,3553 2382,3554 2801,3554 2800,3555 2800,3611 ; 2383,3704 2484,3704 2486,3702 2486,3603 ; 2787,3608 2810,3608 ; 2789,3807 2821,3807 ; 3097,3557 3097,3610.06 ; 3097,3810 3097,3883 ; 3097,3811 3097,3610.06 ; 3099,3608.06 3097,3610.06 ; 3610,3557 3610,3611 ; 3610,3808.32 3610,3880 ; 4079,3882.41 4393.41,3882.41 ; 4100,3554.41 4409.59,3554.41 4411,3554.41 4411,3610 ; 4111,3554.41 4111,3614 ; 4111,3608 4111,3810 ; 4311,3557.41 4311,3882.41 ; 4372,3882.41 4411,3882.41 4411,3879.82 4411,3800
  lines w5.91: 102.61,2609.05 35,2609.05 35,408.05 108.53,408.05 ; 296.61,2609.05 370.61,2609.05 ; 296.61,2610.05 345.61,2610.05 ; 297.09,408.05 370.61,408.05 370.61,2608.05 ; 2694,3554.41 2694,3882.41 ; 2843.96,246.44 2843.96,345.44 ; 2895,20.32 2895,348 ; 3010,3554.41 3010,3882.41 ; 3243.96,248.44 3243.96,347.44 ; 3295.44,21 3295.44,345 ; 3394.44,20 3394.44,348 ; 3815,3554.41 3815,3882.41 ; 4111,3554.41 2810,3554.41 2810,3882.41 4110,3882.41 ; 4345,275 4345,345 ; 2194.44,348 4395.44,348 ; 2194.44,348 2194.44,288 2194.44,348 ; 2194.44,348 4395.44,348 ; 4110,3882.41 4110,3808.41 4110,3882.41 ; 4395.44,21 4395.44,96 4395.44,21 ; 4395.44,21 2195.44,20 4395.44,21 ; 4395.44,21 4394.44,20 4395.44,21 ; 4395.44,348 4395.44,288 4395.44,348 ; 2194.44,20 2194.44,94 2194.44,20 ; 3844.96,249 3844.96,348 3844.96,249
  lines w7.87: 1610,150 1635,125 ; 1635,320 1635,125 ; 1660,150 1635,125 ; 2195,482.5 2495,482.5 ; 2195,545 2495,545 ; 2195,607.5 2495,607.5 ; 2295,420 2295,670 ; 2195,420 2495,420 2495,670 2195,670 2195,420
  lines w10: 5013.39,581.14 cw(c5012.44,652) 5048.15,590.79 ; 5051.01,622.16 5047.44,590 5081.44,590
  lines w11.81: 595.7,3796.99 707.7,3639.99
  lines w12: 678,2876.44 ccw(c686,2876.44) 678.84,2880.02
  lines w15: 661,2833.14 cw(c686,2876.44) 711,2833.14 ; 686,2776.44 686,2851.44 686,2876.44
  text "8" at 2734,3832 h35.43
  text "2" at 2847,3831 h35.43
  text "32" at 4321,3830 h35.43
  text "2" at 2422,3828 h35.43
  text "8" at 3124,3828 h35.43
  text "20" at 3721,3828 h35.43
  text "26" at 4021,3828 h35.43
  text "6" at 3045,3827 h35.43
  text "16" at 3521,3827 h35.43
  text "Pb" at 583.66,3671.32 h100
  text "1" at 795,3600 h118.11
  text "NC" at 4183,3566 h35.43
  text "31" at 4331,3566 h35.43
  text "GND" at 2823,3565 h30
  text "3V3" at 2924,3565 h30
  text "25" at 4023,3565 h35.43
  text "7" at 3133,3564 h35.43
  text "15" at 3521,3564 h35.43
  text "SCI" at 3020,3563 h35.43
  text "GPIO" at 3294,3563 h35.43
  text "SPI" at 3677,3563 h35.43
  text "CAN" at 2700,3562 h35.43
  text "1" at 2430,3555 h35.43
  text "JTAG" at 1805,3430 h78.74
  text "PWR" at 1620,3415 h39.37
  text "DGND" at 4925,3345 h47.24
  text "RUN" at 1625,3315 h39.37
  text "B" at 5235.49,3238.32 h47.24 r270
  text "RS485" at 4650,3060 h39.37
  text "A" at 5243.37,2970.61 h47.24 r270
  text "DC5V" at 615,2965 h59.06
  text "FLASH" at 3555,2890 h47.24
  text "H" at 5238.33,2837.34 h47.24 r270
  text "+" at 716,2776.44 h40
  text "PSU" at 603,2685.44 h59.06
  text "CAN" at 4655,2670 h39.37
  text "L" at 5240.33,2570.34 h47.24 r270
  text "44" at 73.23,2533.11 h35.43 r90
  text "43" at 341.61,2524.05 h35.43 r90
  text "RESET" at 4360,2335 h59.06
  text "IIC" at 4789,2289 h47.24
  text "34" at 80,2035 h35.43 r90
  text "33" at 350,2030 h35.43 r90
  text "AVP32F2812_EVM_V1.0" at 2321.5,1705 h70.87
  text "25/7/1" at 2520,1605 h60
  text "RS232" at 5010,1535 h59.06 r270
  text "21" at 350,1435 h35.43 r90
  text "22" at 85,1430 h35.43 r90
  text "LED" at 4622,1394 h47.24
  text "11" at 343.39,935.95 h35.43 r90
  text "12" at 78.39,930.95 h35.43 r90
  text "Analog" at 4535,825 h59.06
  text "POT" at 4930,745 h59.06
  text "BOOT" at 2200,705 h59.06
  text "+" at 4982.44,623 h70.87
  text "1" at 2235,620 h39.37
  text "XA12" at 2330,620 h39.37
  text "DISPLAY" at 580,595 h70.87
  text "2" at 2230,560 h39.37
  text "XA13" at 2330,555 h39.37
  text "3" at 2230,495 h39.37
  text "XA14" at 2330,495 h39.37
  text "2" at 85,450 h35.43 r90
  text "1" at 353.39,440.95 h35.43 r90
  text "4" at 2225,430 h39.37
  text "XA15" at 2330,430 h39.37
  text "14" at 2818.44,367 h35.43
  text "22" at 3218.44,366 h35.43
  text "34" at 3817.44,366 h35.43
  text "44" at 4314.44,366 h35.43
  text "2" at 2234,361 h35.43
  text "AGND" at 5085,355 h39.37
  text "GND" at 2205,301 h30
  text "HOLD" at 3306,301 h25
  text "ADC" at 3561,301 h35.43
  text "GPIO" at 3045,300 h35.43
  text "ADC" at 4073,300 h35.43
  text "EPWM" at 2510,299 h35.43
  text "1" at 1620,40 h60
  text "1" at 2237,38 h30
  text "13" at 2820.44,36 h35.43
  text "21" at 3219,36 h35.43
  text "EPWM" at 2520,35 h35.43
  text "GPIO" at 3035,35 h35.43
  text "NC" at 3320,35 h35.43
  text "ADC" at 3560,35 h35.43
  text "ADC" at 3560,35 h35.43
  text "33" at 3820.44,32 h35.43
  text "33" at 3820.44,32 h35.43
  text "43" at 4319.44,32 h35.43
  text "43" at 4319.44,32 h35.43
  text "ADC" at 4060,30 h35.43
  text "ADC" at 4060,30 h35.43

## Text inside footprints (layer, text, board x,y; h text height)
CN6: Top Overlay "9" at 5277.79,1378.33 h39.37 r270; Top Overlay "5" at 5176.79,1347.33 h39.37 r270; Top Overlay "1" at 5176.79,1905.33 h39.37 r270; Top Overlay "6" at 5275.79,1894.33 h39.37 r270
DS3: Top Overlay "b" at 1272.67,475.54 h60; Top Overlay "a" at 874.67,483.54 h60; Top Overlay "G1" at 801.67,464.54 h60 r90; Top Overlay "G2" at 1102.67,461.54 h60 r90; Top Overlay "G3" at 1203.67,460.54 h60 r90; Top Overlay "c" at 1069.67,81.54 h60; Top Overlay "d" at 868.67,80.54 h60; Top Overlay "e" at 765.67,82.54 h60; Top Overlay "f" at 973.67,476.54 h60; Top Overlay "g" at 1167.67,83.54 h60; Top Overlay "p" at 970.67,86.54 h60; Top Overlay "G4" at 1314.67,61.54 h60 r90
SW1: Top Overlay "1" at 1809.05,47.23 h47.24; Top Overlay "2" at 1905.05,48.23 h47.24; Top Overlay "3" at 2005.05,48.23 h47.24; Top Overlay "4" at 2105.05,48.23 h47.24